# Altium PCB OFP_VIM_v1.5.2.PcbDoc (part 2 of 3)
Units mil, origin at the board's own origin, x right, y up, seen from the top; angles counter-clockwise.
Board outline 4311.02 x 2539.37 mil, 2 copper layers (Top Layer, Bottom Layer), stack 62.256 mil thick; 96 components, 59 nets, 240 pads, 33 vias.
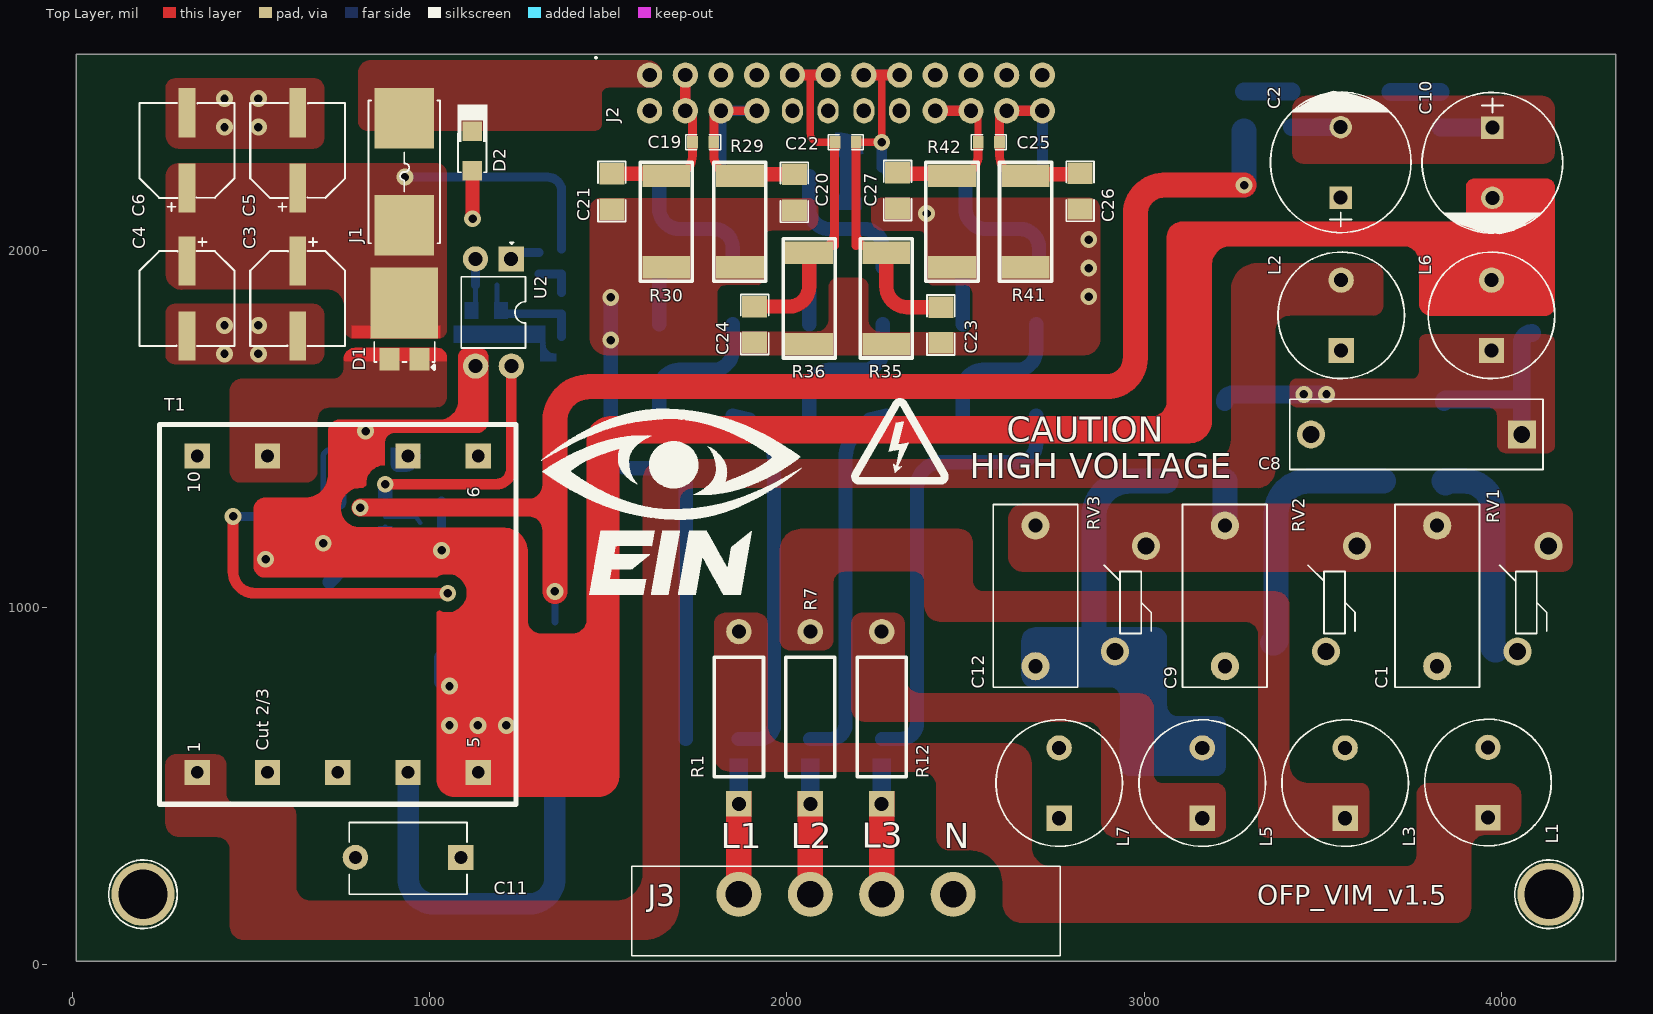
[diagram p0: Top Layer view]

## Part data (continued)
R1 R7 R12: library part FMP200JR-52-1R, "RES 1 OHM 5% 2W AXIAL", Case/Package=Axial, LCSC Part Number=C1741654, Manufacturer=Yageo, Max Operating Temperature=155°C, Max Power Dissipation=2W, Min Operating Temperature=-55°C, Package Quantity=1, Tolerance=5%, ComponentLink1Description=https://datasheet.ciiva.com/2711/yageolr-fmp-2013-2711444.pdf?src-supplier=Digikey, ComponentLink1URL=https://datasheet.ciiva.com/2711/yageolr-fmp-2013-2711444.pdf?src-supplier=Digikey, ComponentLink2Description=https://datasheet.ciiva.com/2711/yageolr-fmp-2013-2711445.pdf?src-supplier=Digikey, ComponentLink2URL=https://datasheet.ciiva.com/2711/yageolr-fmp-2013-2711445.pdf?src-supplier=Digikey, Item Type="Through-Hole Resistors", Lead Free="Lead Free", Length=0.354inch, Manufacturer Part Number=FMP200JR-52-1R, Number of Terminations=2, Packaging="Cut Tape", Pricing="2500=0.0318, 7500=0.031, 12500=0.0306, 25000=0.0301, 50000=0.0293 (USD)", RoHS=Yes, RoHS Compliant=Yes, Series=FMP, Stock=25000, Supplier="Future Electronics"
R2 R3 R9 R11 R13 R16: library part AC1206FR-7W10KL, "RES 10K OHM 1% 1/2W 1206", Case/Package=340Case, LCSC Part Number=C326700, Manufacturer=Yageo, Item Type=Resistors, Manufacturer Part Number=AC1206FR-7W10KL, Packaging=10Packaging, Pricing="1=0.14, 10=0.052, 50=0.052, 100=0.029, 1000=0.018, 10000=0.011 (USD)", RoHS=No, Stock=10222, Supplier=Mouser
R4 R8 R10 R14: library part RT1206BRD07976KL, "RES SMD 976K OHM 0.1% 1/4W 1206", Case Code (Imperial)=1206, Case Code (Metric)=3216, LCSC Part Number=C870948, Manufacturer=Yageo, Max Operating Temperature=125°C, Max Power Dissipation=250mW, Min Operating Temperature=-55°C, Package Quantity=5000, Temperature Coefficient=25ppm/°C, Tolerance=0.1%, Voltage Rating=200V, Case/Package=1206, ComponentLink1Description=https://datasheet.ciiva.com/2587/pyu-rt-1-to-0-05-rohs-l-5-2587907.pdf?src-supplier=Digikey, ComponentLink1URL=https://datasheet.ciiva.com/2587/pyu-rt-1-to-0-05-rohs-l-5-2587907.pdf?src-supplier=Digikey, ComponentLink2Description=https://datasheet.ciiva.com/12704/pyu-rt-1-to-0-05-rohs-l-4-12704248.pdf?src-supplier=Mouser, ComponentLink2URL=https://datasheet.ciiva.com/12704/pyu-rt-1-to-0-05-rohs-l-4-12704248.pdf?src-supplier=Mouser, Height=0.026inch, Item Type=Resistors, Lead Free="Lead Free", Length=0.122inch, Manufacturer Part Number=RT1206BRD07976KL, Number of Terminations=2, Packaging="Tape and Reel", Power Rating=250mW, Pricing="5000=0.0862 (USD)", RoHS=Yes, RoHS Compliant=Yes, Series=RT, Supplier=Digikey, Termination=SMD/SMT, Voltage Rating (DC)=200V, Width=0.063inch
R5: library part AC2010FK-07100RL, "RES SMD 100 OHM 1% 3/4W 2010", Case Code (Imperial)=2010, Case Code (Metric)=5025, LCSC Part Number=C138240, Manufacturer=Yageo, Max Operating Temperature=155°C, Max Power Dissipation=750mW, Min Operating Temperature=-55°C, Ratings=AEC-Q200, Temperature Coefficient=100ppm/°C, Tolerance=1%, Case/Package=2010, ComponentLink1Description=https://www.yageo.com/upload/media/product/productsearch/datasheet/rchip/PYu-AC_51_RoHS_L_7.pdf?src-supplier=Digikey, ComponentLink1URL=https://www.yageo.com/upload/media/product/productsearch/datasheet/rchip/PYu-AC_51_RoHS_L_7.pdf?src-supplier=Digikey, Features="Moisture Resistant,Automotive AEC-Q200", Item Type=Resistors, Manufacturer Part Number=AC2010FK-07100RL, Number of Terminations=2, Packaging="Cut Tape", Pricing="4000=0.0203, 12000=0.0198, 20000=0.0196, 40000=0.0193, 80000=0.0188 (USD)", RoHS=Yes, RoHS Compliant=Yes, Series=AC, Stock=4000, Supplier="Future Electronics"
R6: library part AC2512FK-0747KL, "RES SMD 47K OHM 1% 1W 2512", Case/Package=2512, LCSC Part Number=C728203, Manufacturer=Yageo, Max Operating Temperature=155°C, Max Power Dissipation=1W, Min Operating Temperature=-55°C, Temperature Coefficient=100ppm/°C, Tolerance=1%, Voltage Rating=200V, ComponentLink1Description=http://www.yageo.com/NewPortal/yageodocoutput?fileName=/pdf/R-Chip/PYu-AC_51_RoHS_L_5.pdf&src-supplier=Digikey, ComponentLink1URL=http://www.yageo.com/NewPortal/yageodocoutput?fileName=/pdf/R-Chip/PYu-AC_51_RoHS_L_5.pdf&src-supplier=Digikey, ComponentLink2Description=http://www.yageo.com/NewPortal/yageodocoutput?fileName=/pdf/R-Chip/PYu-AC_51_RoHS_L_6.pdf&src-supplier=Digikey, ComponentLink2URL=http://www.yageo.com/NewPortal/yageodocoutput?fileName=/pdf/R-Chip/PYu-AC_51_RoHS_L_6.pdf&src-supplier=Digikey, ComponentLink3Description=https://www.yageo.com/upload/media/product/productsearch/datasheet/rchip/PYu-AC_51_RoHS_L_7.pdf?src-supplier=Digikey, ComponentLink3URL=https://www.yageo.com/upload/media/product/productsearch/datasheet/rchip/PYu-AC_51_RoHS_L_7.pdf?src-supplier=Digikey, Features="Moisture Resistant,Automotive AEC-Q200", Height=0.026inch, Item Type=Resistors, Length=0.25inch, Manufacturer Part Number=AC2512FK-0747KL, Number of Terminations=2, Packaging="Tape and Reel", Pricing="1=0.59, 10=0.197, 100=0.1907, 1000=0.18462 (USD)", RoHS=Yes, RoHS Compliant=Yes, Series=AC, Stock=7724, Supplier=Digikey, Width=0.122inch
R15: library part RC1206FR-0710RL, "RES 10 OHM 1% 1/4W 1206", LCSC Part Number=C108080, Manufacturer=Yageo, Voltage Rating (AC)=200V, ComponentLink1Description=https://datasheet.ciiva.com/11819/0900766b80c6630a-11819896.pdf?src-supplier=Rs, ComponentLink1URL=https://datasheet.ciiva.com/11819/0900766b80c6630a-11819896.pdf?src-supplier=Rs, ComponentLink2Description=https://datasheet.ciiva.com/22735/444357-22735648.pdf?src-supplier=Farnell, ComponentLink2URL=https://datasheet.ciiva.com/22735/444357-22735648.pdf?src-supplier=Farnell, ComponentLink3Description=https://datasheet.ciiva.com/29181/402303-da-01-en-smd-widerstand-chip1206-10-ohm-29181572.pdf?src-supplier=Conrad, ComponentLink3URL=https://datasheet.ciiva.com/29181/402303-da-01-en-smd-widerstand-chip1206-10-ohm-29181572.pdf?src-supplier=Conrad, ComponentLink4Description=https://datasheet.ciiva.com/2460/pyu-rc1206-51-rohs-l-4-2460048.pdf?src-supplier=Digikey, ComponentLink4URL=https://datasheet.ciiva.com/2460/pyu-rc1206-51-rohs-l-4-2460048.pdf?src-supplier=Digikey, ComponentLink5Description=https://datasheet.ciiva.com/2460/pyu-rc1206-51-rohs-l-4-2460049.pdf?src-supplier=Digikey, ComponentLink5URL=https://datasheet.ciiva.com/2460/pyu-rc1206-51-rohs-l-4-2460049.pdf?src-supplier=Digikey, ComponentLink6Description=https://datasheet.ciiva.com/2460/pyu-rc1206-51-rohs-l-4-2460050.pdf?src-supplier=Digikey, ComponentLink6URL=https://datasheet.ciiva.com/2460/pyu-rc1206-51-rohs-l-4-2460050.pdf?src-supplier=Digikey, ComponentLink7Description=https://datasheet.ciiva.com/46445/444357-46445704.pdf?src-supplier=Element14, ComponentLink7URL=https://datasheet.ciiva.com/46445/444357-46445704.pdf?src-supplier=Element14, ComponentLink8Description=https://datasheet.ciiva.com/16962/pyu-rc1206-51-rohs-l-4-16962857.pdf?src-supplier=Future+Electronics, ComponentLink8URL=https://datasheet.ciiva.com/16962/pyu-rc1206-51-rohs-l-4-16962857.pdf?src-supplier=Future+Electronics, Item Type=Resistor, Lead Free=5697LeadFree, Manufacturer Part Number=RC1206FR-0710RL, Pricing="1=0.125, 25=0.043, 50=0.034, 100=0.026 (USD)", RoHS=Yes, Stock=3696, Supplier=Avnet
R17: library part RC0603FR-0749R9L, "RES 49.9 OHM 1% 1/10W 0603", Case Code (Imperial)=0603, Case Code (Metric)=1608, LCSC Part Number=C114625, Manufacturer=Yageo, Max Operating Temperature=155°C, Max Power Dissipation=100mW, Min Operating Temperature=-55°C, Resistance Tolerance=1%, Resistor Type="Thick Film", Temperature Coefficient=100ppm/°C, Voltage Rating=50V, Case/Package=0603, Category="Chip SMD Resistors", ComponentLink1Description=https://datasheet.ciiva.com/11808/0900766b80f96399-11808223.pdf?src-supplier=RSComponents, ComponentLink1URL=https://datasheet.ciiva.com/11808/0900766b80f96399-11808223.pdf?src-supplier=RSComponents, ComponentLink2Description=https://datasheet.ciiva.com/22747/443971-22747527.pdf?src-supplier=Element14, ComponentLink2URL=https://datasheet.ciiva.com/22747/443971-22747527.pdf?src-supplier=Element14, ComponentLink3Description=https://datasheet.ciiva.com/15189/getdatasheetpartid-325421-15189750.pdf?src-supplier=Verical, ComponentLink3URL=https://datasheet.ciiva.com/15189/getdatasheetpartid-325421-15189750.pdf?src-supplier=Verical, Construction=Rectangular, Depth=0.8mm, Features="Moisture Resistant", Height=0.45mm, Item Type=Resistor, Lead Free="Lead Free", Length=1.6mm, Manufacturer Part Number=RC0603FR-0749R9L, Military Standard=Not, Number of Pins=2, Number of Terminations=2, Packaging="Tape and Reel", Power Rating=100mW, Pricing 1="5000=0.00280 (USD)", REACH SVHC="No SVHC", Resistance=49.9R, RoHS=Yes, RoHS Compliant=Yes, Series=RC, Size Code=0603, Stock 1=2075000, Supplier 1="Arrow Electronics", Supplier Part Number 1=RC0603FR-0749R9L, Technology="THICK FILM", Termination=SMD/SMT, Tolerance=1%, Voltage Rating (DC)=50V
R18: library part RC0805FR-070RL, "RES 0 OHM JUMPER 1/8W 0805", Case Code (Imperial)=0805, Case Code (Metric)=2012, LCSC Part Number=C100045, Manufacturer=Yageo, Max Operating Temperature=155°C, Max Power Dissipation=125mW, Min Operating Temperature=-55°C, Resistance=0mR, Resistor Type="Thick Film", Tolerance=1%, Case/Package=0805, Category="Chip SMD Resistors", ComponentLink1Description=https://datasheet.ciiva.com/15189/getdatasheetpartid-348154-15189885.pdf?src-supplier=Verical, ComponentLink1URL=https://datasheet.ciiva.com/15189/getdatasheetpartid-348154-15189885.pdf?src-supplier=Verical, ComponentLink2Description=https://datasheet.ciiva.com/17042/rc0805-17042698.pdf?src-supplier=Future+Electronics, ComponentLink2URL=https://datasheet.ciiva.com/17042/rc0805-17042698.pdf?src-supplier=Future+Electronics, Construction=Rectangular, Contact Plating=Tin,Matte, Depth=1.25mm, Features="Moisture Resistant", Item Type=Resistor, Lead Free="Lead Free", Length=2mm, Manufacturer Part Number=RC0805FR-070RL, Military Standard=Not, Number of Terminations=2, Packaging="Tape and Reel", Power Rating=125mW, Pricing 1="5000=0.00281, 10000=0.00277, 20000=0.00269 (USD)", Radiation Hardening=No, RoHS=Yes, RoHS Compliant=Yes, Series=RC, Size Code=0805, Stock 1=85000, Supplier 1=Avnet, Supplier Part Number 1=RC0805FR-070RL
R19: library part RC0603FR-07100KL, "RES 100K OHM 1% 1/10W 0603", Case Code (Imperial)=0603, Case Code (Metric)=1608, LCSC Part Number=C14675, Manufacturer=Yageo, Max Operating Temperature=155°C, Max Power Dissipation=100mW, Min Operating Temperature=-55°C, Package Quantity=5000, Resistance Tolerance=1%, Resistor Type="Thick Film", Supplier Part Number=2424020, Temperature Coefficient=100ppm/°C, Voltage Rating=50V, Case/Package=0603, Category="Chip SMD Resistors", ComponentLink1Description=https://datasheet.ciiva.com/11819/0900766b80f96399-11819227.pdf?src-supplier=Rs, ComponentLink1URL=https://datasheet.ciiva.com/11819/0900766b80f96399-11819227.pdf?src-supplier=Rs, ComponentLink2Description=https://datasheet.ciiva.com/2455/pyu-r-int-thick-7-2455183.pdf?src-supplier=Digikey, ComponentLink2URL=https://datasheet.ciiva.com/2455/pyu-r-int-thick-7-2455183.pdf?src-supplier=Digikey, ComponentLink3Description=https://datasheet.ciiva.com/2455/pyu-r-int-thick-7-2455184.pdf?src-supplier=Digikey, ComponentLink3URL=https://datasheet.ciiva.com/2455/pyu-r-int-thick-7-2455184.pdf?src-supplier=Digikey, ComponentLink4Description=https://datasheet.ciiva.com/2455/pyu-r-int-thick-7-2455182.pdf?src-supplier=Digikey, ComponentLink4URL=https://datasheet.ciiva.com/2455/pyu-r-int-thick-7-2455182.pdf?src-supplier=Digikey, Construction=Rectangular, Depth=0.8mm, Features="Moisture Resistant", Height=0.45mm, Item Type=Resistors, Lead Free=5697LeadFree, Length=1.6mm, Manufacturer Part Number=RC0603FR-07100KL, Military Standard=Not, Mounting Technology="Surface Mount", Number of Terminations=2, Packaging="Tape and Reel", Pins=2, Power Rating=100mW, Reach SVHC Compliant=No, RoHS=Yes, RoHS Compliant=Yes, Series=RC, Stock=27300, Supplier=Rs, Technology="THICK FILM", Termination=SMD/SMT, Tolerance=1%, Voltage Rating (DC)=50V, Weight=7.1E-05oz, Width=0.8mm
R20: library part RC0603FR-074K99L, "RES 4.99K OHM 1% 1/10W 0603", Case Code (Imperial)=0603, Case Code (Metric)=1608, LCSC Part Number=C114621, Manufacturer=Yageo, Max Operating Temperature=155°C, Max Power Dissipation=100mW, Min Operating Temperature=-55°C, Resistance Tolerance=1%, Resistor Type="Thick Film", Temperature Coefficient=100ppm/°C, Voltage Rating=75V, Voltage Rating (DC)=50V, Case/Package=0603, Construction=Rectangular, Depth=0.8mm, Features="Moisture Resistant", Height=0.45mm, Item Type=Resistors, Lead Free="Lead Free", Length=1.6mm, Manufacturer Part Number=RC0603FR-074K99L, Military Standard=Not, Number of Terminations=2, Packaging="Tape and Reel", Pins=2, Power Rating=100mW, Pricing="5000=0.0009, 50000=0.0009, 150000=0.0008, 625000=0.0008, 1500000=0.0008 (USD)", Reach SVHC Compliant=Unknown, RoHS=Yes, RoHS Compliant=Yes, Series=RC, Stock=205000, Supplier="Future Electronics", Termination=SMD/SMT, Tolerance=1%, Weight=7.1E-05oz, Width=0.8mm
R21: library part RC0603FR-071KL, "RES SMD 1K OHM 1% 1/10W 0603", Case Code (Imperial)=0603, Case Code (Metric)=1608, LCSC Part Number=C22548, Manufacturer=Yageo, Max Operating Temperature=155°C, Min Operating Temperature=-55°C, Power Rating=100mW, Resistance=1kR, Supplier Part Number 1=311-1.00KHRDKR-ND, Temperature Coefficient=100ppm/°C, Tolerance=1%, Voltage Rating=50V, Case/Package=0603, ComponentLink1Description=https://www.verical.com/server-webapp/html/getDatasheet?partID=409289&src-supplier=Verical, ComponentLink1URL=https://www.verical.com/server-webapp/html/getDatasheet?partID=409289&src-supplier=Verical, ComponentLink2Description=http://documents.rs-components.com/techlib://itc_doclist_GB.htm?stockno=5048928&src-supplier=RSComponents, ComponentLink2URL=http://documents.rs-components.com/techlib://itc_doclist_GB.htm?stockno=5048928&src-supplier=RSComponents, ComponentLink3Description=http://www.yageo.com/documents/recent/PYu-RC0603_51_RoHS_L_4.pdf?src-supplier=Avnet+Europe, ComponentLink3URL=http://www.yageo.com/documents/recent/PYu-RC0603_51_RoHS_L_4.pdf?src-supplier=Avnet+Europe, ComponentLink4Description=http://www.farnell.com/datasheets/2167052.pdf?src-supplier=Element14, ComponentLink4URL=http://www.farnell.com/datasheets/2167052.pdf?src-supplier=Element14, ComponentLink5Description=http://www.farnell.com/datasheets/1868787.pdf?src-supplier=Element14, ComponentLink5URL=http://www.farnell.com/datasheets/1868787.pdf?src-supplier=Element14, ComponentLink6Description=http://www.yageo.com/documents/recent/PYu-RC_Group_51_RoHS_L_2.pdf?src-supplier=Avnet, ComponentLink6URL=http://www.yageo.com/documents/recent/PYu-RC_Group_51_RoHS_L_2.pdf?src-supplier=Avnet, ComponentLink7Description=https://www.verical.com/server-webapp/html/getDatasheet?partID=404327&src-supplier=Verical, ComponentLink7URL=https://www.verical.com/server-webapp/html/getDatasheet?partID=404327&src-supplier=Verical, ComponentLink8Description=http://www.farnell.com/datasheets/443971.pdf?src-supplier=Element14, ComponentLink8URL=http://www.farnell.com/datasheets/443971.pdf?src-supplier=Element14, Composition="Thick Film", Contact Plating=Tin,Matte, Depth=0.8mm, Height=0.45mm, Item Type=Resistor, Lead Free="Lead Free", Length=1.6mm, Manufacturer Part Number=RC0603FR-071KL, Military Standard=Not, Packaging="Tape and Reel", Pricing 1="1=0.1, 10=0.023, 100=0.0094, 1000=0.0042, 2500=0.0037 (USD)", Radiation Hardening=No, REACH SVHC="No SVHC", Stock 1=21472395, Supplier 1=Digi-Key, Termination=SMD/SMT
R22: library part RT0603BRD0766K5L, "RES SMD 66.5KOHM 0.1% 1/10W 0603", LCSC Part Number=C861515, Manufacturer=Yageo, Voltage Rating (DC)=50V, ComponentLink1Description=https://datasheet.ciiva.com/12809/pyu-rt-1-to-0-05-rohs-l-4-12809883.pdf?src-supplier=Mouser, ComponentLink1URL=https://datasheet.ciiva.com/12809/pyu-rt-1-to-0-05-rohs-l-4-12809883.pdf?src-supplier=Mouser, Item Type=Resistors, Lead Free=5697LeadFree, Manufacturer Part Number=RT0603BRD0766K5L, Pricing="1=0.14, 10=0.102, 50=0.0846, 100=0.0755, 500=0.05814, 1000=0.04896 (USD)", RoHS=Yes, Stock=16544, Supplier=Digikey
R23: library part RL1206FR-7W0R75L, "RES 0.75 OHM 1% 1/2W 1206", LCSC Part Number=C859938, Manufacturer=Yageo, ComponentLink1Description=http://www.mouser.com/ds/2/447/PYu-RL_Group_521_RoHS_L_2-1131815.pdf?src-supplier=Mouser, ComponentLink1URL=http://www.mouser.com/ds/2/447/PYu-RL_Group_521_RoHS_L_2-1131815.pdf?src-supplier=Mouser, ComponentLink2Description=https://www.yageo.com/upload/media/product/productsearch/datasheet/rchip/PYu-RL_Group_521_RoHS_L_2.pdf?src-supplier=Digikey, ComponentLink2URL=https://www.yageo.com/upload/media/product/productsearch/datasheet/rchip/PYu-RL_Group_521_RoHS_L_2.pdf?src-supplier=Digikey, ComponentLink3Description=http://www.yageo.com/exep/pages/download/literatures/R-chip_current%20sensor_20140512.pdf?src-supplier=Digikey, ComponentLink3URL=http://www.yageo.com/exep/pages/download/literatures/R-chip_current%20sensor_20140512.pdf?src-supplier=Digikey, ComponentLink4Description=https://datasheet.octopart.com/RL1206FR-7W0R75L-Yageo-datasheet-83209227.pdf?src-supplier=Future+Electronics, ComponentLink4URL=https://datasheet.octopart.com/RL1206FR-7W0R75L-Yageo-datasheet-83209227.pdf?src-supplier=Future+Electronics, Item Type=Resistors, Manufacturer Part Number=RL1206FR-7W0R75L, Pricing="1=0.36, 10=0.095, 100=0.0857, 1000=0.0765, 2500=0.07497 (USD)", RoHS=Yes, Stock=5438, Supplier=Digikey
R24: library part RT0603BRD0726K1L, "RES SMD 26.1KOHM 0.1% 1/10W 0603", LCSC Part Number=C728586, Manufacturer=Yageo, ComponentLink1Description=https://datasheet.ciiva.com/12809/pyu-rt-1-to-0-05-rohs-l-4-12809765.pdf?src-supplier=Mouser, ComponentLink1URL=https://datasheet.ciiva.com/12809/pyu-rt-1-to-0-05-rohs-l-4-12809765.pdf?src-supplier=Mouser, ComponentLink2Description=https://datasheet.ciiva.com/8889/pyu-rt-1-to-0-05-rohs-l-4-8889966.pdf?src-supplier=Avnet, ComponentLink2URL=https://datasheet.ciiva.com/8889/pyu-rt-1-to-0-05-rohs-l-4-8889966.pdf?src-supplier=Avnet, Item Type=Resistors, Manufacturer Part Number=RT0603BRD0726K1L, Pricing="5000=0.0192, 15000=0.0188, 20000=0.0186, 50000=0.0183, 75000=0.0179 (USD)", RoHS=Yes, Stock=40000, Supplier="Future Electronics"
R25 R26 R27 R28 R31 R32 R33 R34 R37 R38 R39 R40: library part CRCW2512200KFKEG, "RES SMD 200K OHM 1% 1W 2512", LCSC Part Number=C2078538, Manufacturer="Vishay Dale", Voltage Rating (DC)=500V, ComponentLink1Description=https://datasheet.ciiva.com/16435/dcrcwe3-16435690.pdf?src-supplier=Future+Electronics, ComponentLink1URL=https://datasheet.ciiva.com/16435/dcrcwe3-16435690.pdf?src-supplier=Future+Electronics, ComponentLink2Description=https://datasheet.ciiva.com/5545/dcrcwe3-109170-5545692.pdf?src-supplier=Mouser, ComponentLink2URL=https://datasheet.ciiva.com/5545/dcrcwe3-109170-5545692.pdf?src-supplier=Mouser, Item Type=Resistors, Lead Free=5697LeadFree, Manufacturer Part Number=CRCW2512200KFKEG, Pricing="1=0.3, 10=0.127, 50=0.127, 100=0.082, 1000=0.067, 10000=0.047 (USD)", RoHS=Yes, Stock=29311, Supplier=Mouser
R29 R30 R35 R36 R41 R42: library part RC2512JK-071KL, "RES 1K OHM 5% 1W 2512", Case Code (Imperial)=2512, Case Code (Metric)=6432, LCSC Part Number=C137010, Manufacturer=Yageo, Max Operating Temperature=155°C, Max Power Dissipation=1W, Min Operating Temperature=-55°C, Resistance Tolerance=5%, Resistor Type="Thick Film", Supplier Part Number=9067984, Temperature Coefficient=100ppm/°C, Voltage Rating=200V, Case/Package=2512, Category="Chip SMD Resistors", ComponentLink1Description=https://datasheet.ciiva.com/5595/pyu-rc2512-51-rohs-l-4-5595927.pdf?src-supplier=Mouser, ComponentLink1URL=https://datasheet.ciiva.com/5595/pyu-rc2512-51-rohs-l-4-5595927.pdf?src-supplier=Mouser, ComponentLink2Description=https://datasheet.ciiva.com/7672/638316-7672039.pdf?src-supplier=Element14, ComponentLink2URL=https://datasheet.ciiva.com/7672/638316-7672039.pdf?src-supplier=Element14, ComponentLink3Description=https://datasheet.ciiva.com/7672/638316-7672038.pdf?src-supplier=Element14, ComponentLink3URL=https://datasheet.ciiva.com/7672/638316-7672038.pdf?src-supplier=Element14, Contact Plating=Tin,Lead, Features="Moisture Resistant", Height=0.026inch, Item Type=Resistor, Lead Free=5697LeadFree, Length=0.25inch, Manufacturer Part Number=RC2512JK-071KL, Number of Terminations=2, Packaging="Tape and Reel", Power Rating=1W, Pricing="4000=0.0216, 16000=0.0207, 40000=0.0201, 100000=0.0195, 160000=0.0187 (USD)", Reach SVHC Compliant=Unknown, RoHS=Yes, RoHS Compliant=Yes, Series=RC, Stock=596000, Supplier="Future Electronics", Technology="THICK FILM", Termination=SMD/SMT, Tolerance=5%, Width=3.1mm, Working Voltage=200V
RV1 RV2 RV3: "775V 385V 300V 470V Plugin Varistors ROHS", LCSC Part Number=C522648, Manufacturer=Yageo, Item Type=Varistors, Manufacturer Part Number=471KD10J, Pricing="1=0.43, 10=0.27, 50=0.27, 100=0.187, 1000=0.145, 10000=0.096 (USD)", RoHS=Yes, Stock=1519, Supplier=Mouser
T1: "12V/1.5A transformer", Package=Custom, Item Type=Transformer, Manufacturer Part Number=FTEFD25-037
U1: "IC OFFLINE SW MULT TOP 8VSSOP", Case/Package=MSOP, Frequency=500kHz, LCSC Part Number=C202233, Manufacturer="TI National Semiconductor", Max Operating Temperature=125°C, Max Supply Voltage=30V, Min Operating Temperature=-40°C, Min Supply Voltage=8V, Nominal Supply Voltage=15V, Output Current=100mA, Output Voltage=600mV, Quiescent Current=2.5mA, Switching Frequency=1MHz, ComponentLink1Description=https://datasheet.ciiva.com/1513/1771307-1513330.pdf?src-supplier=Element14, ComponentLink1URL=https://datasheet.ciiva.com/1513/1771307-1513330.pdf?src-supplier=Element14, ComponentLink2Description=https://datasheet.ciiva.com/49118/1767118-49118582.pdf?src-supplier=Element14, ComponentLink2URL=https://datasheet.ciiva.com/49118/1767118-49118582.pdf?src-supplier=Element14, ComponentLink3Description=https://datasheet.ciiva.com/49118/1767118-49118263.pdf?src-supplier=Element14, ComponentLink3URL=https://datasheet.ciiva.com/49118/1767118-49118263.pdf?src-supplier=Element14, ComponentLink4Description=https://datasheet.ciiva.com/46389/1888908-46389836.pdf?src-supplier=Element14, ComponentLink4URL=https://datasheet.ciiva.com/46389/1888908-46389836.pdf?src-supplier=Element14, ComponentLink5Description=https://datasheet.ciiva.com/6613/lm5021-6613338.pdf?src-supplier=Digikey, ComponentLink5URL=https://datasheet.ciiva.com/6613/lm5021-6613338.pdf?src-supplier=Digikey, ComponentLink6Description=https://datasheet.ciiva.com/6613/lm5021-6613340.pdf?src-supplier=Digikey, ComponentLink6URL=https://datasheet.ciiva.com/6613/lm5021-6613340.pdf?src-supplier=Digikey, ComponentLink7Description=https://datasheet.ciiva.com/6613/lm5021-6613336.pdf?src-supplier=Digikey, ComponentLink7URL=https://datasheet.ciiva.com/6613/lm5021-6613336.pdf?src-supplier=Digikey, Duty Cycle=80%, Fall Time=10ns, Item Type=IC, Lead Free="Lead Free", Manufacturer Part Number=LM5021MM-1/NOPB, Mounting Technology="Surface Mount", Packaging="Tape and Reel", Pins=8, Pricing="1=1.4, 10=1.04, 50=1.04, 100=0.968, 1000=0.887, 10000=0.856 (USD)", Reach SVHC Compliant=No, Rise Time=25ns, RoHS=Yes, RoHS Compliant=Yes, Series=-, Stock=1237, Supplier=Mouser, Termination=SMD/SMT, Thickness=970um, Topology=Flyback
U2: "OPTOISOLATOR 5KV TRANSISTOR 4DIP", LCSC Part Number=C900909, Manufacturer="ON Semiconductor / Fairchild", ComponentLink1Description=https://datasheet.ciiva.com/25620/0900766b810e24fa-25620684.pdf?src-supplier=Rs, ComponentLink1URL=https://datasheet.ciiva.com/25620/0900766b810e24fa-25620684.pdf?src-supplier=Rs, ComponentLink2Description=https://datasheet.ciiva.com/15118/getdatasheetpartid-67083-15118459.pdf?src-supplier=Verical, ComponentLink2URL=https://datasheet.ciiva.com/15118/getdatasheetpartid-67083-15118459.pdf?src-supplier=Verical, ComponentLink3Description=https://datasheet.ciiva.com/27056/2016920-27056231.pdf?src-supplier=Jameco, ComponentLink3URL=https://datasheet.ciiva.com/27056/2016920-27056231.pdf?src-supplier=Jameco, ComponentLink4Description=https://datasheet.ciiva.com/12239/fod817a-12239227.pdf?src-supplier=Mouser, ComponentLink4URL=https://datasheet.ciiva.com/12239/fod817a-12239227.pdf?src-supplier=Mouser, ComponentLink5Description=https://datasheet.ciiva.com/8095/fod817d-8095131.pdf?src-supplier=Avnet, ComponentLink5URL=https://datasheet.ciiva.com/8095/fod817d-8095131.pdf?src-supplier=Avnet, ComponentLink6Description=https://datasheet.ciiva.com/2086/fod814a-2086034.pdf?src-supplier=Digikey, ComponentLink6URL=https://datasheet.ciiva.com/2086/fod814a-2086034.pdf?src-supplier=Digikey, ComponentLink7Description=https://datasheet.ciiva.com/16741/fod817-16741992.pdf?src-supplier=Future+Electronics, ComponentLink7URL=https://datasheet.ciiva.com/16741/fod817-16741992.pdf?src-supplier=Future+Electronics, Item Type=IC, Manufacturer Part Number=FOD817A, Pricing="100=0.0832, 500=0.0801, 2500=0.0771, 10000=0.0747, 25000=0.0712 (USD)", RoHS=Yes, Stock=9100, Supplier="Future Electronics"
U3: "IC VREF SHUNT ADJ 1% SOT23-3", LCSC Part Number=C134067, Manufacturer="Texas Instruments", ComponentLink1Description=http://www.ti.com/general/docs/lit/getliterature.tsp?genericPartNumber=ATL431&&fileType=pdf&src-supplier=Element14, ComponentLink1URL=http://www.ti.com/general/docs/lit/getliterature.tsp?genericPartNumber=ATL431&&fileType=pdf&src-supplier=Element14, ComponentLink2Description=http://www.ti.com/general/docs/lit/getliterature.tsp?genericPartNumber=ATL431&amp;&amp;fileType=pdf&src-supplier=Element14, ComponentLink2URL=http://www.ti.com/general/docs/lit/getliterature.tsp?genericPartNumber=ATL431&amp;&amp;fileType=pdf&src-supplier=Element14, ComponentLink3Description=http://www.ti.com/lit/ds/symlink/atl431.pdf?src-supplier=Digikey, ComponentLink3URL=http://www.ti.com/lit/ds/symlink/atl431.pdf?src-supplier=Digikey, ComponentLink4Description=http://www.ti.com/general/docs/lit/getliterature.tsp?genericPartNumber=ATL432&&fileType=pdf&src-supplier=Avnet, ComponentLink4URL=http://www.ti.com/general/docs/lit/getliterature.tsp?genericPartNumber=ATL432&&fileType=pdf&src-supplier=Avnet, ComponentLink5Description=http://www.ti.com/general/docs/lit/getliterature.tsp?genericPartNumber=ATL431&&fileType=pdf&src-supplier=Farnell, ComponentLink5URL=http://www.ti.com/general/docs/lit/getliterature.tsp?genericPartNumber=ATL431&&fileType=pdf&src-supplier=Farnell, Height=1.22mm, Item Type=IC, Lead Free=5697LeadFree, Length=2.92mm, Manufacturer Part Number=ATL431AIDBZR, Pricing="1=0.41, 10=0.252, 50=0.252, 100=0.202, 1000=0.184, 10000=0.15 (USD)", RoHS=Yes, Stock=1938, Supplier=Mouser, Thickness=1mm, Width=1.3mm

## Free pads (board coordinates)
  round 177.17 hole 137.8: MH2(196.85,196.85) MH2(4133.86,196.85)

## Via types
v1: diameter 47.24, hole 23.62, Top Layer to Bottom Layer, 33 vias

## Nets (pads, with @x,y where several pads share a name; then routed paths per layer and width w, separated by ;. In a path a pad name is that pad's centre, name@x,y a point inside that pad or via, vN(x,y) a via of type N, cw(c..) or ccw(c..) an arc to the next point about the centre after c; other vN are vias at no path point)
12V: C3.1 C4.1 C5.1 C6.1 D1.3 J1.1 R17.2 | length 633.8
  Bottom Layer w25: v1(930,2205) 1330.24,2205 cw(c1330.24,2166.11) 1369.13,2166.11 ; R17.2@1369.13,2003.69 1369.13,2176.11
100VDC-623VDC: C2.1 L2.2 R3.2 R4.2 R5.2 R6.2 T1.1
GND: C3.2 C4.2 C5.2 C6.2 C11.2 D2.1 J2.24 R24.1 T1.7 U3.3 | length 124.7
  Top Layer w25: D2.1@1119,2222.88 D2.1@1119.38,2222.5 ; v1@1119.38,2098.87 v1@1119.76,2098.49
  Top Layer w40: v1@1119.38,2098.87 D2.1@1119.38,2222.5
  other v1: 425,1710 520,1710 425,1789.76 520,1789.76 1119.76,2088.49 425,2345.24 520,2345.24 425,2425 520,2425
NetBR1_1: BR1.1 BR2.1 C8.2 L2.1 R3.1
NetBR1_2: BR1.2 C9.2 L3.2 R9.2 RV2.2 | length 720.6
  Bottom Layer w70: 3360,900 ccw(c3360,910) 3370,910 3370,1263.59 cw(c3459.9,1263.59) 3459.9,1353.49 BR1.2@3670,1353.49
NetBR1_3: BR1.3 C1.2 L1.2 R2.2 RV1.2 | length 587.1
  Bottom Layer w70: BR1.3@3843.94,1349.12 BR1.3@3839.57,1353.49 3897.51,1353.49 cw(c3897.51,1274) 3977,1274 3977,890 ccw(c3986,890) 3986,881
NetBR1_4: BR1.4 BR2.4 C8.1 L6.1 R11.1 | length 819.1
  Bottom Layer w50: BR2.4@3226.13,1575.33 cw(c3247.33,1575.33) 3247.33,1596.54 v1(3510.83,1596.54) ; BR1.4@3839.57,1575.33 cw(c3847.08,1575.33) 3847.08,1582.84 4057.77,1582.84 ; C8.1@4057.77,1484.41 4057.77,1582.84 ; R11.1@4086,1768.14 ccw(c4086,1739.91) 4057.77,1739.91 4057.77,1582.84
  other v1: 3447.73,1596.54
NetBR2_2: BR2.2 C12.2 L5.2 R13.2 RV3.2 | length 851.5
  Bottom Layer w70: C12.2@2695.95,835.49 2875.88,835.49 ccw(c2875.88,837.47) 2877.86,837.47 ; RV3.2@2918.41,876.84 2916.74,878.51 2902.98,878.51 2859.28,922.21 2859.28,1253.49 cw(c2959.28,1253.49) 2959.28,1353.49 BR2.2@3061.51,1353.49
NetBR2_3: BR2.3 C1.1 C9.1 C12.1 L7.2 R16.2 RV1.1 RV2.1 RV3.1 | length 124.3
  Bottom Layer w70: C9.1@3226.13,1229.19 BR2.3@3226.13,1353.49
NetC2_2: C2.2 C10.1 R8.1 R10.2 | length 282.5
  Bottom Layer w50: R10.2@3413.49,2344.85 C2.2@3550.65,2344.85 ; R8.1@3830,2343.85 C10.1@3975.34,2343.85
NetC7_1: C7.1 D3.1 R6.1
NetC7_2: C7.2 R5.1
NetC13_1: C13.1 C15.2 R14.1 R15.1 U1.2 | length 4102.4
  Top Layer w50: v1(805.06,1279.09) 805.76,1279.8 1276.53,1279.8 ; 1340,1216.32 ccw(c1276.53,1216.32) 1276.53,1279.8 ; 1340,1343.27 cw(c1276.53,1343.27) 1276.53,1279.8 ; 1343.67,1279.8 1276.53,1279.8
  Top Layer w70: v1(1350,1045) 1350,1273.47 ; 1350,1279.8 1350,1343.27 1350,1521.39 cw(c1447.17,1521.39) 1447.17,1618.55 2895.88,1618.55 ccw(c2895.88,1698.08) 2933.62,1628.08 ccw(c2895.88,1698.08) 2935.38,1629.05 ccw(c2895.88,1698.08) 2964.91,1658.58 ccw(c2895.88,1698.08) 2975.41,1698.08 2975.41,2101.53 cw(c3056.26,2101.53) 3056.26,2182.38 v1(3280,2182.38)
  Bottom Layer w12: v1(805.06,1279.09) 805.41,1279.44 874.26,1279.44 U1.2@874.61,1279.8 952.11,1279.8 ccw(c952.11,1297.8) 964.02,1284.3 C15.2@973,1297.8
  Bottom Layer w20: R15.1@1350,960 v1(1350,1045)
  Bottom Layer w70: v1(3280,2182.38) R14.1@3280,2334.42
NetC14_1: C14.1 R19.1 R24.2 U3.2 | length 313.8
  Bottom Layer w15: C14.1@1188,1902.97 1188,1844.68 U3.2@1195.4,1837.28
  Bottom Layer w25: U3.2@1195.4,1837.28 1195.4,1835.31 1199.04,1831.67 1204.63,1831.67 1213.69,1822.61 R19.1@1369.13,1822.61 R24.2@1369.13,1758.54
NetC14_2: C14.2 U2.2 U3.1 | length 153.1
  Bottom Layer w15: U3.1@1120.6,1837.28 ccw(c1120.6,1844.68) 1128,1844.68 C14.2@1128,1902.97 C14.2@1127.8,1902.97
  Bottom Layer w25: C14.2@1127.8,1902.97 U2.2@1127.8,1985.99
NetC16_2: C16.2 U1.8 | length 184.6
  Bottom Layer w15: U1.8@701.39,1307 701.39,1422.32 cw(c720,1422.32) 720,1440.94 C16.2@760,1440.94
NetC17_2: C17.2 U1.3 | length 106.7
  Bottom Layer w12: U1.3@874.61,1254.2 952.88,1254.2 cw(c952.88,1236.61) 964.16,1250.11 C17.2@973.01,1236.61
NetC18_2: C18.2 R21.1 U1.6 | length 161.2
  Bottom Layer w13: R21.1@599.35,1254.2 U1.6@701.39,1254.2
  Bottom Layer w20: C18.2@599.35,1195 R21.1@599.35,1254.2
NetD1_1: D1.1 D1.2 T1.9
NetD3_2: D3.2 Q1.2 T1.3
NetD4_1: D4.1 R15.2 | length 153.5
  Bottom Layer w50: D4.1@1350,706.48 R15.2@1350,860
NetD4_2: D4.2 T1.4 | length 1111
  Bottom Layer w60: T1.4@939.07,538.17 939.07,243.44 ccw(c1012.51,243.44) 1012.51,170 1278.67,170 ccw(c1278.67,241.33) 1350,241.33 D4.2@1350,564
NetFB1_2: FB1.2 R25.1 | length 1047.6
  Bottom Layer w40: R25.1@1848.16,1537.59 1895.09,1526.09 1936.85,1482.25 cw(c1865.6,1414.38) 1964,1414.38 1964,672.36 cw(c1923.38,672.36) 1923.38,631.74 FB1.2@1865.35,631.74
NetFB2_2: FB2.2 R31.1 | length 1047.7
  Bottom Layer w40: FB2.2@2065.35,631.74 2123.43,631.74 ccw(c2123.43,672.31) 2164,672.31 2164,1418.42 2164,1418.53 cw(c2262.81,1418.53) 2193.49,1488.94 2231.23,1526.09 R31.1@2278.16,1537.59
NetFB3_2: FB3.2 R37.1 | length 1266.3
  Bottom Layer w40: FB3.2@2266,631.74 2319.5,631.74 ccw(c2319.5,676.24) 2364,676.24 2364,1336.52 cw(c2434.48,1336.52) 2434.48,1407 2646,1407 ccw(c2646,1459.16) 2698.16,1459.16 R37.1@2698.16,1537.59
NetL1_1: L1.1 R1.2 R2.1
NetL3_1: L3.1 R7.2 R9.1
NetL5_1: L5.1 R12.2 R13.1
NetQ1_1: Q1.1 R18.2 | length 107.2
  Bottom Layer w40: Q1.1@718.93,1071.33 R18.2@793.21,1148.65
NetQ1_3: Q1.3 R21.2 R23.2 | length 870.8
  Top Layer w30: v1(448.98,1255) 448.98,1100.43 448.98,1100.36 ccw(c509.34,1100.36) 509.34,1040 509.45,1040 v1(1050,1040)
  Bottom Layer w25: v1@458.98,1255 459.77,1254.2 R21.2@539.35,1254.2
NetR4_1: R4.1 R8.2 | length 140
  Bottom Layer w50: R4.1@3690,2443.85 R8.2@3830,2443.85
NetR10_1: R10.1 R14.2 | length 133.5
  Bottom Layer w50: R14.2@3280,2444.85 R10.1@3413.49,2444.85
NetR17_1: R17.1 R19.2 R20.2 | length 114.2
  Bottom Layer w25: R20.2@1306.22,1933.79 R17.1@1369.03,1933.79 ; R19.2@1369.13,1882.61 1368.77,1882.97 1368.77,1933.32 R17.1@1369.13,1933.69
NetR18_1: R18.1 U1.4 | length 69.6
  Bottom Layer w15: R18.1@875,1155 U1.4@875,1224.61
NetR20_1: R20.1 U2.1 | length 88.4
  Bottom Layer w15: U2.1@1227.79,1976 cw(c1245.48,1976) U2.1@1245.48,1993.7
  Bottom Layer w25: U2.1@1245.48,1993.7 R20.1@1306.13,1993.7
NetR22_2: R22.2 U1.7 | length 152.9
  Bottom Layer w12: U1.7@701.39,1279.8 746.17,1279.8 ccw(c746.17,1293.63) 760,1293.63 R22.2@760,1380
NetR25_2: R25.2 R26.1 | length 414.3
  Bottom Layer w40: R26.1@1642.16,1537.59 1642.16,1608.88 cw(c1698.81,1608.88) 1698.81,1665.54 1793.79,1665.54 ccw(c1793.79,1719.91) 1848.16,1719.91 R25.2@1848.16,1793.49
NetR26_2: R26.2 R27.1 | length 159.1
  Bottom Layer w40: R26.2@1642.16,1793.49 R27.1@1642.16,1952.59
NetR27_2: R27.2 R28.1 | length 414.3
  Bottom Layer w40: R27.2@1642.16,2208.49 1642.16,2117.85 ccw(c1700.48,2117.85) 1700.48,2059.53 1795.45,2059.53 cw(c1795.45,2006.82) 1848.16,2006.82 R28.1@1848.16,1952.59
NetR31_2: R31.2 R32.1 | length 414.3
  Bottom Layer w40: R32.1@2062.16,1537.59 2062.16,1608.88 cw(c2118.81,1608.88) 2118.81,1665.54 2213.79,1665.54 ccw(c2213.79,1719.91) 2268.16,1719.91 R31.2@2268.16,1793.49
NetR32_2: R32.2 R33.1 | length 159.1
  Bottom Layer w40: R32.2@2062.16,1793.49 R33.1@2062.16,1952.59
NetR33_2: R33.2 R34.1 | length 414.3
  Bottom Layer w40: R33.2@2062.16,2208.49 2062.16,2117.85 ccw(c2120.48,2117.85) 2120.48,2059.53 2215.45,2059.53 cw(c2215.45,2006.82) 2268.16,2006.82 R34.1@2268.16,1952.59
NetR37_2: R37.2 R38.1 | length 414.3
  Bottom Layer w40: R38.1@2492.16,1537.59 2492.16,1608.89 cw(c2548.81,1608.89) 2548.81,1665.54 2643.79,1665.54 ccw(c2643.79,1719.91) 2698.16,1719.91 R37.2@2698.16,1793.5
NetR38_2: R38.2 R39.1 | length 159.1
  Bottom Layer w40: R38.2@2492.16,1793.49 R39.1@2492.16,1952.59
NetR39_2: R39.2 R40.1 | length 414.3
  Bottom Layer w40: R39.2@2500,2208.49 2500,2117.85 ccw(c2558.32,2117.85) 2558.32,2059.53 2653.29,2059.53 cw(c2653.29,2006.82) 2706,2006.82 R40.1@2706,1952.59
NetU1_1: U1.1 U2.4 | length 705.7
  Top Layer w30: v1(875,1345) 1185.58,1345 ccw(c1185.58,1387.62) 1228.2,1387.62 U2.4@1228.2,1676
  Bottom Layer w12: U1.1@874.61,1305.39 875,1305.77 v1(875,1345)
NEUTRAL: FB4.1 J3.4 L7.1 R16.1
NGND: C20.1 C21.1 C23.1 C24.1 C26.1 C27.1 FB4.2 J2.1 J2.3 J2.12 R29.1 R30.1 R35.1 R36.1 R41.1 R42.1 | length 1404.2
  Bottom Layer w40: v1(1506.5,1868.49) v1(1506.5,1748.54) 1506.5,1440.2 ccw(c1556.7,1440.2) 1556.7,1390 1666.85,1390 cw(c1666.85,1339.85) 1717,1339.85 FB4.2@1717,631.74
  other v1: 2845,1870.47 2845,1950.24 2845,2030 2391.16,2103.17
PGND: C10.2 C11.1 C13.2 C15.1 C16.1 C17.1 C18.1 L6.2 R11.2 R22.1 R23.1 T1.5 U1.5 U2.3 | length 659.6
  Bottom Layer w12: v1(701.39,1180) U1.5@701.39,1228.61
  Bottom Layer w25: C18.1@539.35,1195 539.35,1135.65 v1(540,1135) ; R22.1@820,1380 C16.1@820,1440.94 v1(820,1493.78) ; v1(1033.01,1160) C17.1@1033.01,1236.61 C15.1@1033,1297.8
  Bottom Layer w40: 1031,791.71 R23.1@1031,859.06
  Bottom Layer w50: L6.2@3973,1916.57 3973,2144.66 cw(c3975.34,2144.66) C10.2@3975.34,2147
  other v1: 1055,670 1134.76,670 1214.53,670 1055,779.76
VA_INPUT: FB1.1 J3.1 R1.1
VA_N: C19.2 C21.2 J2.21 J2.22 R30.2 | length 686.4
  Top Layer w25: R30.2@1662.16,2208.49 1719.09,2225.8 ccw(c1678.05,2265.8) 1735.35,2265.8 C19.2@1735.35,2302.65 1735.35,2370.95 ccw(c1715.35,2370.95) J2.22@1715.35,2390.95 J2.21@1715.35,2490.95
  Top Layer w30: J2.22@1715.35,2390.95 J2.21@1715.35,2490.95
  Top Layer w40: C21.2@1509.77,2214.78 R30.2@1655.87,2214.78
  Bottom Layer w30: J2.22@1715.35,2390.95 J2.21@1715.35,2490.95
VA_P: C19.1 C20.2 J2.18 J2.20 R28.2 R29.2 | length 785.5
  Top Layer w25: R29.2@1868.55,2208.49 1868.19,2208.6 1811.62,2225.8 cw(c1852.66,2265.8) 1795.35,2265.8 1795.35,2370.95 cw(c1815.35,2370.95) J2.20@1815.35,2390.95 J2.18@1915.35,2390.95
  Top Layer w40: R29.2@1874.76,2212.88 C20.2@2020.86,2212.88
  Bottom Layer w30: R28.2@1848.16,2208.49 1815.35,2232.49 J2.20@1815.35,2390.95 J2.18@1915.35,2390.95
VB_INPUT: FB2.1 J3.2 R7.1